# Altium PCB 24V-7A-Power-Board-v1.0.PcbDoc (part 1 of 4)
Units mil, origin at the board's own origin, x right, y up, seen from the top; angles counter-clockwise.
Board outline 6000 x 4000 mil, 2 copper layers (Top Layer, Bottom Layer); 157 components, 80 nets, 383 pads, 0 vias.
Unrouted connection lines stored in the file: 290.
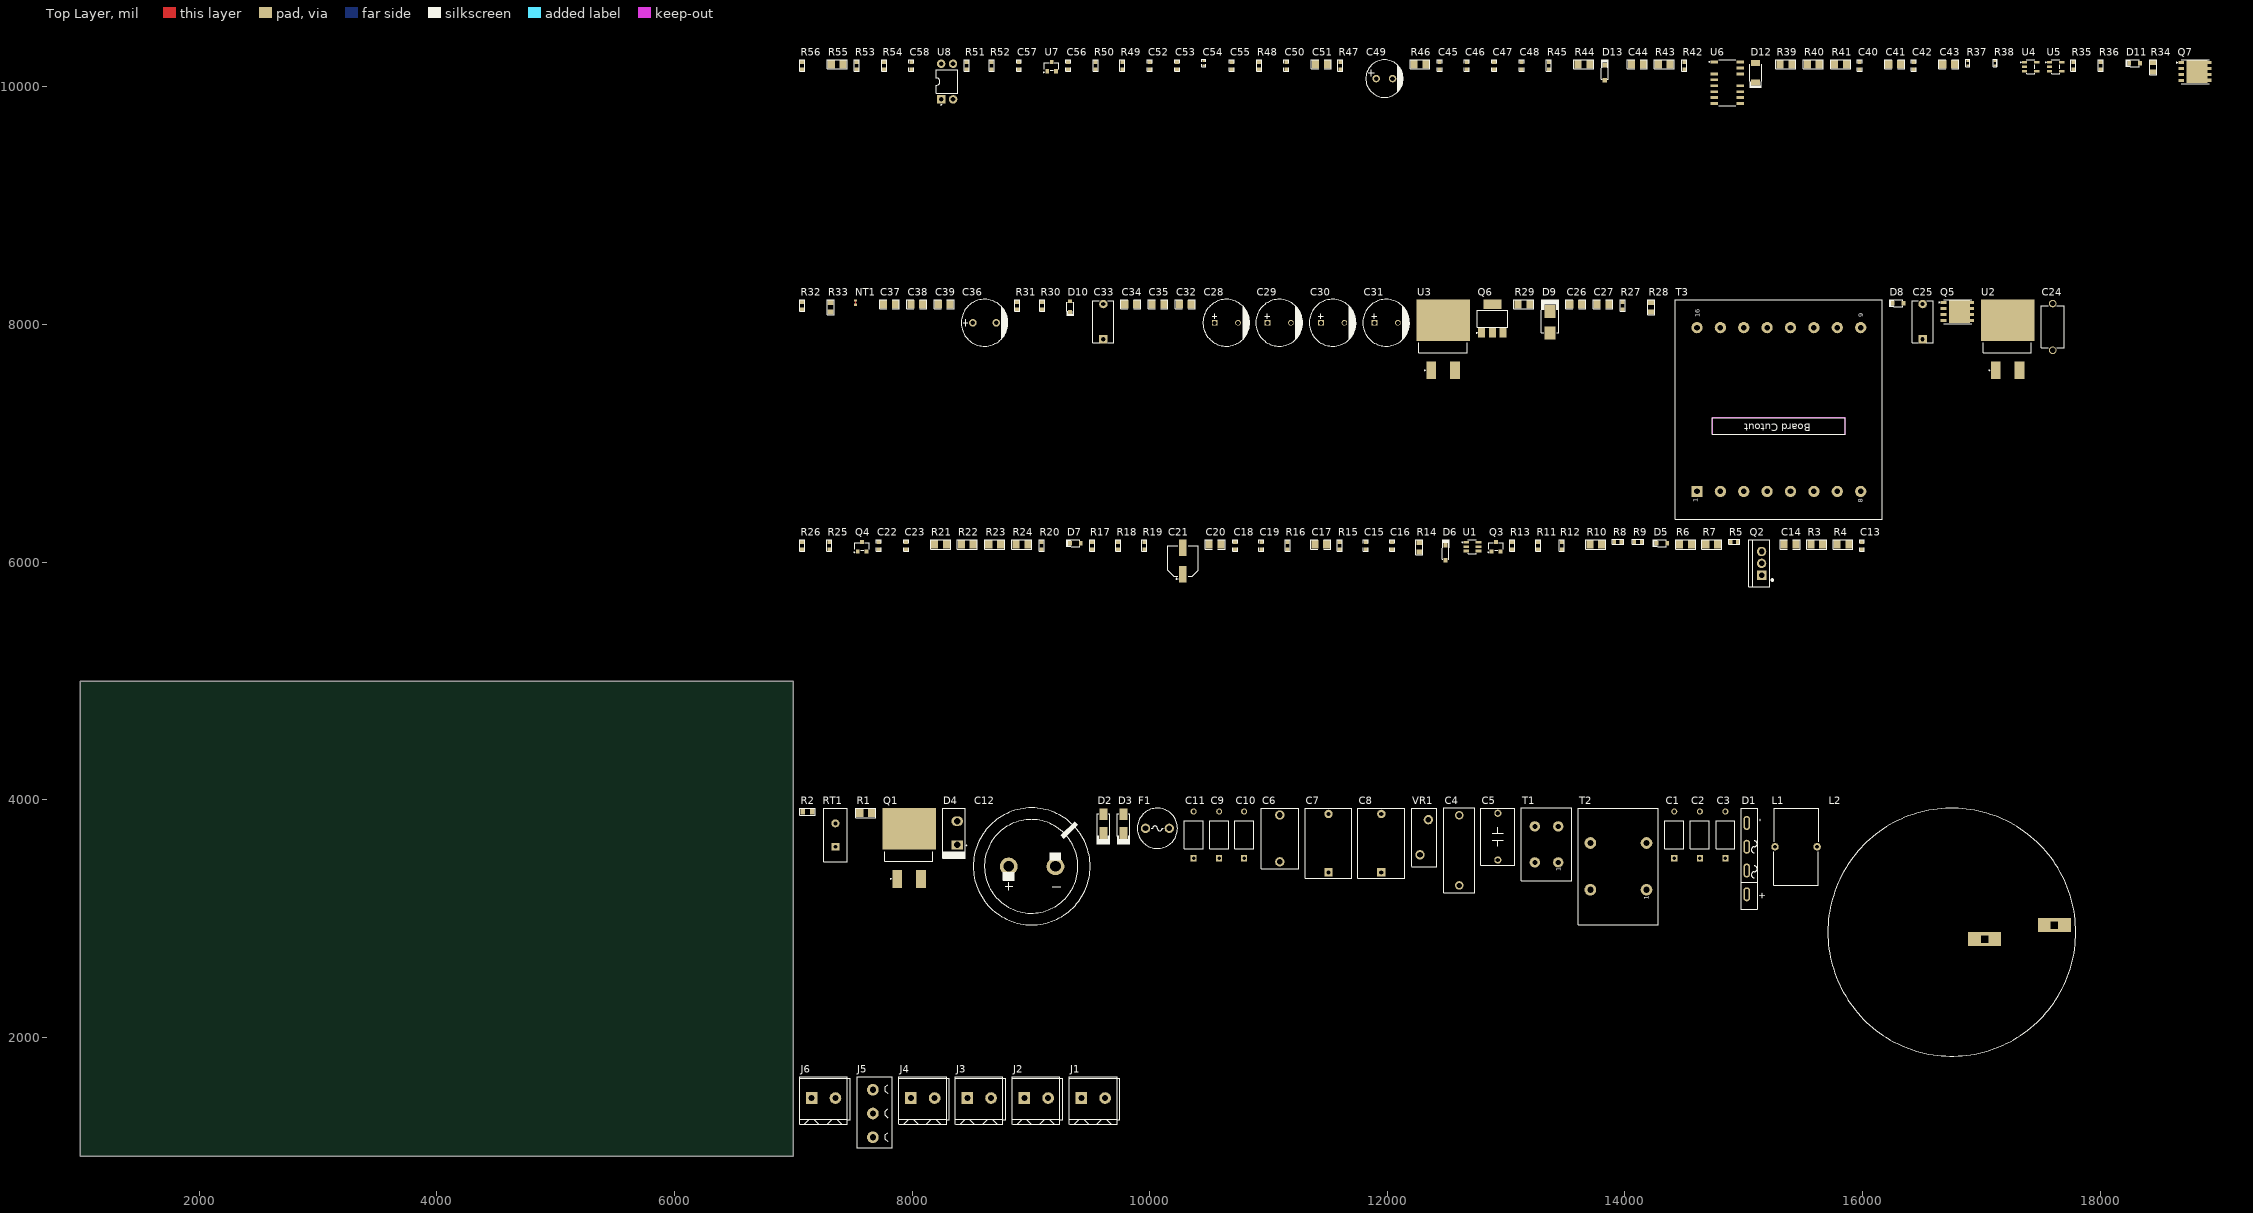
[diagram p0: Top Layer view]
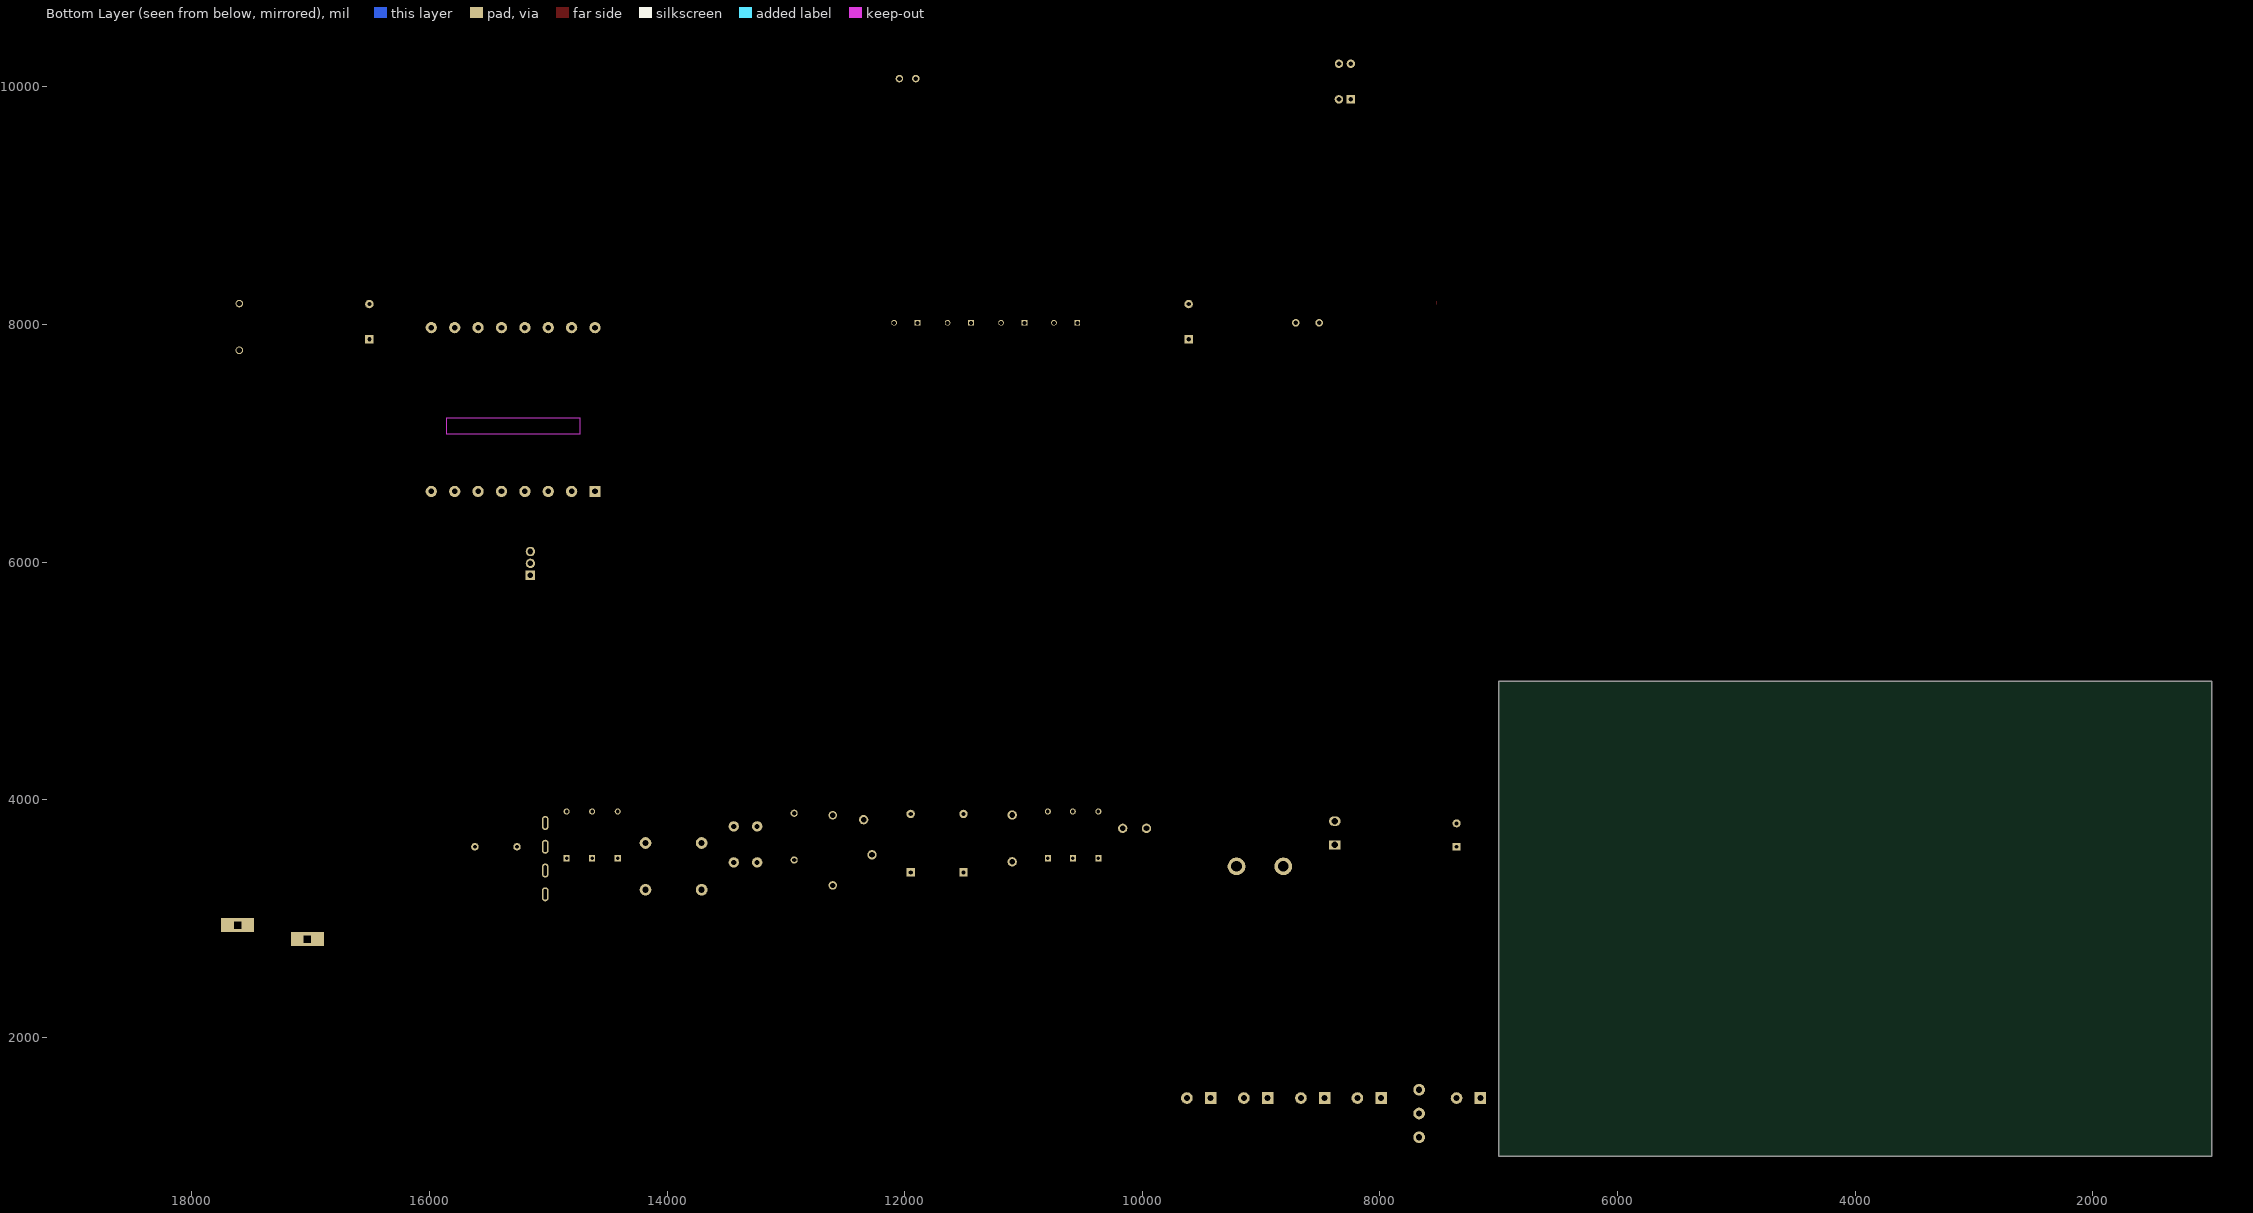
[diagram p1: Bottom Layer view, seen from below]

## Layer stack, top to bottom
Top Solder: solder mask 0.4, Solder Resist, Dk 3.5
Top Layer: signal copper 1.4
Dielectric 1: dielectric 12.6, FR-4, Dk 4.8
Bottom Layer: signal copper 1.4
Bottom Solder: solder mask 0.4, Solder Resist, Dk 3.5

## Board outline
1000,1000 7000,1000 7000,5000 1000,5000

## Design rules (kind name [scope] priority, off if disabled: settings)
Clearance [All] p1: gap=10 ignorepadtopadclearanceinfootprint=FALSE
PolygonConnect [All] p1: connectstyle=Relief reliefconductorwidth=10 reliefentries=4 polygonreliefangle="90 Angle" airgapwidth=10
RoutingVias [All] p1: holewidth=28 width=50 viastyle="Through Hole" minholewidth=28 minwidth=50 maxholewidth=28 maxwidth=50
SolderMaskExpansion [All] p1: expansion=4 istentingtop=FALSE
SupplyNets "Schematic Supply Nets_4" [InNet('GND')] p1: voltage=0.000
SupplyNets "Schematic Supply Nets_3" [InNet('SGND')] p2: voltage=0.000
SupplyNets "Schematic Supply Nets_2" [InNet('AC_N')] p3: voltage=0.000
SupplyNets "Schematic Supply Nets_1" [InNet('EARTH')] p4: voltage=0.000
SupplyNets "Schematic Supply Nets" [InNet('AC_L')] p5: voltage=0.000
Width [All] p1: maxlimit=10 minlimit=10 preferedwidth=10
30 further rules are at their usual default settings.

## Classes and differential pairs
component class U_Power_Controller_Sheet: C24 C25 C26 C27 C28 C29 C30 C31 C32 C33 C34 C35 C36 C37 C38 C39 C40 C41 C42 C43 C44 C45 C46 C47 C48 C49 C50 C51 C52 C53 C54 C55 C56 C57 C58 D8 D9 D10 D11 D12 D13 NT1 Q5 Q6 Q7 R27 R28 R29 R30 R31 R32 R33 R34 R35 R36 R37 R38 R39 R40 R41 R42 R43 R44 R45 R46 R47 R48 R49 R50 R51 R52 R53 R54 R55 R56 T3 U2 U3 U4 U5 U6 U7 U8
component class U_PFC_Sheet: C1 C2 C3 C4 C5 C6 C7 C8 C9 C10 C11 C12 C13 C14 C15 C16 C17 C18 C19 C20 C21 C22 C23 D1 D2 D3 D4 D5 D6 D7 F1 L1 L2 Q1 Q2 Q3 Q4 R1 R2 R3 R4 R5 R6 R7 R8 R9 R10 R11 R12 R13 R14 R15 R16 R17 R18 R19 R20 R21 R22 R23 R24 R25 R26 RT1 T1 T2 U1 VR1
component class U_Connector_Sheet: J1 J2 J3 J4 J5 J6

## Components (designator, comment, footprint, x,y, rotation, side; value= is the part's Value field where it differs from the comment)
C1 "100pF" DE1B3RA101KN4AN01F 14415,3705 r90 top
C2 "220pF" DE1B3RA221KN4AN01F 14630,3705 r90 top
C3 "220pF" DE1B3RA221KN4AN01F 14845,3705 r90 top
C4 "470nF" 450MPK474J 12605,3575 r90 top
C5 "MPP105J2W10KN22605" MPP105J2W10KN22605 12930,3690 r90 top
C6 "220nF" X2P2224KN1B0130150080ES0 11095,3675 r90 top
C7 "0.47UF" 890324024005 11505,3635 r90 top
C8 "0.47UF" 890324024005 11950,3635 r90 top
C9 "220pF" DE1B3RA221KN4AN01F 10585,3705 r90 top
C10 "220pF" DE1B3RA221KN4AN01F 10795,3705 r90 top
C11 "100pF" DE1B3RA101KN4AN01F 10370,3705 r90 top
C12 "150uF" KN151M45025*30A 9010,3440 r0 top
C13 "0.1uF" Cap-0603 15995,6140 r90 top value=100nF
C14 "10pF" Cap-1206 15390,6150 r0 top
C15 "3.9nF" Cap-0603 11820,6140 r90 top
C16 "560pF" Cap-0603 12040,6140 r90 top
C17 "470nF" Cap-1206 11440,6150 r0 top
C18 "68nF" Cap-0603 10720,6140 r90 top
C19 "0.22uF" Cap-0603 10940,6140 r90 top
C20 "0.47uF" Cap-1206 10550,6150 r0 top
C21 "10uF" 50SVPF10M 10280,6010 r90 top
C22 "06031C102KAT2A" Cap-0603 7720,6140 r90 top
C23 "10pF" Cap-0603 7950,6140 r90 top
C24 "2.2nF" DE1E3RA222MA4BN01F 17600,7980 r90 top
C25 "KP223J2J0701" KP223J2J0701 16505,8025 r90 top
C26 "4.7uF" Cap-1206 13585,8170 r0 top
C27 "4.7uF" Cap-1206 13815,8170 r0 top
C28 "680uF" EEU-FR1V681B 10645,8015 r0 top
C29 "680uF" EEU-FR1V681B 11090,8015 r0 top
C30 "680uF" EEU-FR1V681B 11540,8015 r0 top
C31 "680uF" EEU-FR1V681B 11990,8015 r0 top
C32 "0.1uF" Cap-1206 10300,8170 r0 top value=100nF
C33 "KP223J2J0701" KP223J2J0701 9610,8025 r90 top
C34 "150pF" Cap-1206 9840,8170 r0 top
C35 "100pF" Cap-1206 10070,8170 r0 top
C36 "470uF" EEUFR1V471B 8610,8015 r0 top
C37 "2.2uF" Cap-1206 7810,8170 r0 top
C38 "4.7uF" Cap-1206 8040,8170 r0 top
C39 "4.7uF" Cap-1206 8270,8170 r0 top
C40 "2.2uF" CAP-0603 15975,10180 r90 top
C41 "0.1uF" Cap-1206 16270,10190 r0 top value=100nF
C42 "2.2uF" CAP-0603 16430,10180 r90 top
C43 "0.1uF" Cap-1206 16725,10190 r0 top value=100nF
C44 "2.2uF" Cap-1206 14105,10190 r0 top
C45 "4.7uF" Cap-0603 12440,10180 r90 top
C46 "4.7uF" Cap-0603 12670,10180 r90 top
C47 "4.7uF" Cap-0603 12900,10180 r90 top
C48 "0.01uF" Cap-0603 13130,10180 r90 top
C49 "330uF" RC035M331LO8*14TH-2A1E 11975,10070 r0 top
C50 "2.2uF" Cap-0603 11150,10180 r90 top
C51 "1uF" Cap-1206 11445,10190 r0 top
C52 "220pF" Cap-0603 10000,10180 r90 top
C53 "10nF" Cap-0603 10230,10180 r90 top
C54 "47pF" Cap-0402 10455,10200 r90 top
C55 "82nF" Cap-0603 10690,10180 r90 top
C56 "4.7nF" Cap-0603 9315,10180 r90 top
C57 "470pF" Cap-0603 8900,10180 r90 top
C58 "47pF" Cap-0603 7995,10180 r90 top
D1 "GBU806" GBU 15025,3505 r90 top
D2 "MURA160T3G" SMA 9610,3800 r90 top
D3 "MURA160T3G" SMA 9780,3800 r90 top
D4 "STTH8L06FP" TO-220-2 8380,3720 r90 top
D5 "MMDL914-TP" SOD-323 14310,6160 r0 top
D6 "1N4148W" SOD-123 12490,6080 r90 top
D7 "MMDL914-TP" SOD-323 9375,6160 r0 top
D8 "MMDL914-TP" SOD-323 16300,8180 r0 top
D9 "STPS160UY" SMB_ 13370,8020 r90 top
D10 "MMDL914-TP" SOD-323 9330,8150 r90 top
D11 "MMSZ5250BS-7-F" SOD-323 18290,10200 r0 top
D12 "ES1JAF" "DO-214AD (SMAF)" 15100,10120 r90 top value=15pF
D13 "1N4148W-7-F" SOD-123 13830,10120 r90 top value=2pF
F1 "5A 250VAC" 37215000001 10065,3760 r0 top
J1 "WJ500V-5.08-2P" WJ500V-5.08-2P 9525,1490 r0 top
J2 "WJ500V-5.08-2P" WJ500V-5.08-2P 9045,1490 r0 top
J3 "WJ500V-5.08-2P" WJ500V-5.08-2P 8565,1490 r0 top
J4 "WJ500V-5.08-2P" WJ500V-5.08-2P 8090,1490 r0 top
J5 "WJ500V-5.08-3P" WJ500V-5.08-3P 7670,1160 r90 top
J6 "WJ500V-5.08-2P" WJ500V-5.08-2P 7255,1490 r0 top
L1 "100uH" 7447021 15440,3605 r90 top
L2 "118uH" 760801401 17615,2945 r0 top
NT1 "Net Tie_SMD" "Net Tie Pad" 7525,8185 r90 top net-tie
Q1 "STB26NM60N" TO-263 7975,3545 r0 top
Q2 "IPP60R099C7XKSA1" TO-220-3 15150,5990 r90 top
Q3 "SI2309CDS-T1-E3" SOT-23 12915,6130 r0 top
Q4 "MMBT4401-7-F" SOT-23 7580,6130 r0 top
Q5 "CSD19502Q5B" VSON-CLIP-8(6x5) 16800,8110 r0 top
Q6 "FZT651TA" "SOT- 223" 12885,8050 r0 top
Q7 "CSD19502Q5B" VSON-CLIP-8(6x5) 18800,10130 r0 top
R1 "3.09MR" Res-1206 7610,3890 r0 top
R2 "1M" RES-0805 7120,3900 r0 top value=1MR
R3 "3.3MR" Res-1206 15615,6150 r0 top
R4 "3.09MR" Res-1206 15835,6150 r0 top
R5 "10R" Res-0603 14920,6170 r0 top
R6 "3.3MR" Res-1206 14510,6150 r0 top
R7 "3.3MR" Res-1206 14730,6150 r0 top
R8 "1R" Res-0603 13940,6170 r0 top
R9 "82.5K" Res-0603 14110,6170 r0 top
R10 "3.3MR" Res-1206 13755,6150 r0 top
R11 "36.5K" Res-0603 13270,6140 r90 top
R12 "120K" Res-0603 13470,6140 r90 top value=120kR
R13 "3K" Res-0603 13050,6140 r90 top value=3kR
R14 "10R" RES-0805 12270,6125 r90 top
R15 "24.3K" Res-0603 11600,6140 r90 top
R16 "100K" Res-0603 11160,6140 r90 top value=100kR
R17 "390K" Res-0603 9515,6140 r90 top value=390kR
R18 "75K" Res-0603 9735,6140 r90 top value=75kR
R19 "75K" Res-0603 9955,6140 r90 top value=75kR
R20 "140K" Res-0603 9090,6140 r90 top
R21 "130mR" Res-1206 8240,6150 r0 top
R22 "130mR" Res-1206 8465,6150 r0 top
R23 "150mR" Res-1206 8695,6150 r0 top
R24 "150mR" Res-1206 8925,6150 r0 top
R25 "390K" Res-0603 7305,6140 r90 top value=390kR
R26 "49K9" Res-0603 7075,6140 r90 top
R27 "10R" Res-0603 13980,8160 r90 top
R28 "10K" RES-0805 14220,8145 r90 top
R29 "0R" Res-1206 13150,8170 r0 top value=0mR
R30 "26.1K" Res-0603 9095,8160 r90 top value=26.1kR
R31 "7.15K" Res-0603 8885,8160 r90 top
R32 "10R" Res-0603 7075,8160 r90 top
R33 "10K" RES-0805 7315,8145 r90 top
R34 "5.6K" RES-0805 18445,10165 r90 top value=5.6kR
R35 "10K" Res-0603 17775,10180 r90 top value=10kR
R36 "4.99K" Res-0603 18005,10180 r90 top
R37 "0R" Res-0402 16885,10200 r90 top
R38 "0R" Res-0402 17115,10200 r90 top
R39 "1.65K" Res-1206 15355,10190 r0 top
R40 "1.65K" Res-1206 15585,10190 r0 top
R41 "1.65K" Res-1206 15815,10190 r0 top
R42 "2.2R" Res-0603 14500,10180 r90 top
R43 "4.99MR" Res-1206 14330,10190 r0 top
R44 "4.99MR" Res-1206 13655,10190 r0 top
R45 "274K" Res-0603 13360,10180 r90 top
R46 "4.99MR" Res-1206 12275,10190 r0 top
R47 "100R" Res-0603 11605,10180 r90 top
R48 "301K" res-0603 10920,10180 r90 top
R49 "37.4K" Res-0603 9770,10180 r90 top
R50 "44.2K" Res-0603 9545,10180 r90 top
R51 "0R" Res-0603 8460,10180 r90 top
R52 "324K" Res-0603 8670,10180 r90 top value=324kR
R53 "324K" Res-0603 7535,10180 r90 top value=324kR
R54 "20R" Res-0603 7765,10180 r90 top
R55 "20K" Res-1206 7370,10190 r0 top
R56 "12.4K" Res-0603 7075,10180 r90 top value=12.4kR
RT1 "B57236S0100M000" B57236S0100M000 7355,3605 r90 top
T1 "744822301" 744822301 13340,3625 r90 top
T2 "744824310" 744824310 13945,3440 r90 top value=10mH
T3 "760895741" 760895741 15295,7285 r90 top value=400uH
U1 "UCC28056DBVT" SOT-23-6 12715,6130 r0 top
U2 "IPB65R150CFDA" TO-263 17220,7825 r0 top
U3 "IPB65R150CFDA" TO-263 12470,7825 r0 top
U4 "UCC24612-2DBVR" SOT-23-5 17415,10170 r0 top
U5 "UCC24612-2DBVR" SOT-23-5 17625,10170 r0 top
U6 "UCC256404DDBR" UCC256404DDBR 14860,10035 r0 top
U7 "ATL432LIAQDBZRQ1" SOT-23 9175,10170 r0 top
U8 "VO618A-3" DIP-4 8295,10045 r90 top
VR1 "B72210S2271K101" B72210S2271K101 12310,3685 r90 top value=195pF

## Footprints (in the part's own frame and the unit in brackets; to place one, negate y for a bottom-side part, rotate by r counter-clockwise, add the part's x,y. Pads: shape width x height; smd on the part's side, far side on the other; paste and mask are expansions set on the pad)
50SVPF10M [mm]
  rect 3.5x1.6 smd: 1(-2.8,0) 2(2.8,0)
  silkscreen extent -4.01,-3.3 3.3,3.3, body extent -3.65,-3.3 3.65,3.3, height 5.9
450MPK474J [mm]
  round 1.8 hole 1.092 paste-2539.97 mask+0: 1(-7.5,0) 2(7.5,0)
  silkscreen extent -9.06,-3.3 9.06,3.3, body extent -9,-3.25 9,3.25, height 11.8
7447021 [mm]
  round 1.6 hole 0.82: 1(0,4.5) 2(0,-4.5)
  silkscreen extent -8.25,-4.78 8.25,4.8, body extent -8.21,-4.75 8.21,4.75, height 16.41
744822301 [mm]
  round 2.2 hole 1.1: 1(-3.85,-2.5) 2(3.85,-2.5) 3(3.85,2.5) 4(-3.85,2.5)
  silkscreen extent -7.81,-5.43 7.81,5.43, body extent -7.76,-5.4 7.76,5.37, height 19.6
744824310 [mm]
  round 2.5 hole 1.3: 1(-5,-6) 2(5,-6) 3(5,6) 4(-5,6)
  silkscreen extent -12.45,-8.53 12.42,8.59, body extent -12.4,-8.5 12.4,8.53, height 29.58
760801401 [mm]
  rect 7x3 hole 1.5 square: 1(0,0) 2(-14.95,-3)
  round 0 hole 4.4 unplated: M1(-21.95,-1.5)
  silkscreen extent -48.45,-28 4.55,25, body extent -46.09,-25.64 5.01,22.54, height 27.69
760895741 [mm]
  rect 2.4x2.4 hole 1.2: 1(-17.5,17.5)
  round 2.4 hole 1.2: 2(-17.5,12.5) 3(-17.5,7.5) 4(-17.5,2.5) 5(-17.5,-2.5) 6(-17.5,-7.5) 7(-17.5,-12.5) 8(-17.5,-17.5) 9(17.5,-17.5) 10(17.5,-12.5) 11(17.5,-7.5) 12(17.5,-2.5) 13(17.5,2.5) 14(17.5,7.5) 15(17.5,12.5) 16(17.5,17.5)
  Keep-Out Layer board cut-out: -1.8,14.25 -5.3,14.25 -5.3,-14.25 -1.8,-14.25
  silkscreen extent -23.42,-22.12 23.42,22.12, body extent -23.3,-22 23.3,22, height 26.85
37215000001 [mm]
  round 2 hole 1.2 paste-2539.97 mask+0.051: 1(-2.54,0) 2(2.54,0)
  silkscreen extent -4.3,-4.3 4.3,4.3, body extent -4.2,-4.19 4.2,4.19, height 8
890324024005 [mm]
  rect 1.8x1.8 hole 0.92: 1(-6.25,0)
  round 1.8 hole 0.92: 2(6.25,0)
  silkscreen extent -7.5,-5 7.5,5, body extent -7.5,-5 7.5,5, height 16.2
B57236S0100M000 [mm]
  rect 1.7x1.7 hole 0.85: 1(0,0)
  round 1.7 hole 0.85: 2(5,0)
  silkscreen extent -3.25,-2.5 8.25,2.5, body extent -3.25,-3 8.25,3, height 15.98
B72210S2271K101 [mm]
  round 2 hole 1.2 paste-2539.97 mask+0.051: 1(-3.749,0.899) 2(3.749,-0.899)
  silkscreen extent -6.27,-2.72 6.25,2.7, body extent -6.25,-2.7 6.25,2.7, height 13.35
Cap-0402 [mil]
  rect 18x25 smd mask+2.36: 1(-18.5,0) 2(18.5,0)
  silkscreen extent -31,-16 31,16, body extent -20,-10 20,10, height 19
Cap-0603 [mil]
  rect 30x35 smd mask+2.36: 1(-30,0) 2(30,0)
  silkscreen extent -49,-21 49,21, body extent -32,-16 31,16, height 34
CAP-0603 [mil]
  rect 30x35 smd mask+2.36: 1(-30,0) 2(30,0)
  silkscreen extent -49,-21 49,21, body extent -32,-16 31,16, height 34
Cap-1206 [mil] "SMD 1206"
  rect 60x70 smd: 1(-50,0) 2(50,0)
  silkscreen extent -84,-39 84,39, body extent -63,-31 63,32, height 39
DE1B3RA101KN4AN01F [mm]
  rect 1.3x1.3 hole 0.8: 1(-5,0)
  round 1.3 hole 0.8: 2(5,0)
  silkscreen extent -3,-2 3,2, body extent -5.5,-2 5.5,2, height 9
DE1B3RA221KN4AN01F [mm]
  rect 1.3x1.3 hole 0.8: 1(-5,0)
  round 1.3 hole 0.8: 2(5,0)
  silkscreen extent -3,-2 3,2, body extent -5.5,-2 5.5,2, height 9
DE1E3RA222MA4BN01F [mm]
  round 1.6 hole 1.1 paste-2539.97 mask+0.051: 1(-5,0) 2(5,0)
  silkscreen extent -4.5,-2.5 4.5,2.5, body extent -5.34,-2.53 5.34,2.47, height 13
DIP-4 [mm]
  rect 1.8x1.8 hole 1 paste-2539.97 mask+0.051: 1(-3.81,1.265)
  round 1.8 hole 1 copper offset 0,0 paste-2539.97 mask+0.051: 2(-3.81,-1.275) 3(3.81,-1.265) 4(3.81,1.275)
  silkscreen extent -4.98,-2.28 2.53,2.29, body extent -3.91,-2.3 3.91,2.3, height 4.29
"DO-214AD (SMAF)" [mm]
  rect 1.34x1.9 smd paste+0 mask+0.051: 1(-2.08,0) 2(2.08,0)
  silkscreen extent -3.28,-1.3 1.75,1.3, body extent -2.35,-1.25 2.35,1.25, height 1
EEU-FR1V681B [mm]
  rect 1.2x1.2 hole 0.85: 1(-2.5,0)
  round 1.2 hole 0.85: 2(2.5,0)
  silkscreen extent -5,-5 5.03,5, body extent -5,-5 5,5, height 20
EEUFR1V471B [mm]
  round 1.6 hole 1 paste-2539.97 mask+0.05: 1(-2.5,0) 2(2.5,0)
  silkscreen extent -5,-5 5,5, body extent -4.99,-5 5,5, height 24.91
GBU [mm]
  oval 3x1.4 hole 0.7 slot 2.2 at 0 deg paste-2539.97 mask+0.051: 1(-7.62,0) 2(-2.54,0) 3(2.54,0) 4(7.62,0)
  silkscreen extent -10.8,-2.28 10.79,1.25, body extent -10.75,-2.26 10.75,1.2, height 19.9
KN151M45025*30A [mm]
  round 3.8 hole 2.3 paste-2539.97 mask+0.05: 1(-5,0) 2(5,0)
  silkscreen extent -12.58,-12.5 12.42,12.5, body extent -12.51,-12.49 12.5,12.5, height 40.01
KP223J2J0701 [mm]
  rect 1.8x1.8 hole 0.914 paste-2539.97 mask+0.051: 1(-3.75,0)
  round 1.8 hole 0.914 paste-2539.97 mask+0.051: 2(3.75,0)
  silkscreen extent -4.5,-2.25 4.5,2.25, body extent -4.5,-2.2 4.5,2.2, height 11.57
MPP105J2W10KN22605 [mil]
  round 60 hole 36 paste-99999 mask+1.97: 1(-196.85,0) 2(196.85,0)
  silkscreen extent -239,-142 239,142, body extent -236,-140 236,140, height 673
"Net Tie Pad" [mil]
  rect 18x25 smd mask-10: 1(-18.5,0) 2(18.5,0)
  Top Layer region: -15,-5 15,-5 15,5 -15,5
RC035M331LO8*14TH-2A1E [mm]
  round 1.6 hole 1 paste-2539.97 mask+0.051: 1(-1.75,0) 2(1.75,0)
  silkscreen extent -3.96,-4 4.04,4, body extent -4,-4.01 4,4, height 8
Res-0402 [mil]
  rect 18x25 smd mask+2.17: 1(-18.5,0) 2(18.5,0)
  silkscreen extent -32,-17 32,16, body extent -23,-11 23,11, height 16
Res-0603 [mil]
  rect 30x35 smd: 1(-30,0) 2(30,0)
  silkscreen extent -48,-21 48,21, body extent -31,-17 31,17, height 18
res-0603 [mil]
  rect 30x35 smd: 1(-30,0) 2(30,0)
  silkscreen extent -48,-21 48,21, body extent -31,-17 31,17, height 18
RES-0805 [mil] "SMD 0805"
  rect 40x50 smd: 1(-40,0) 2(40,0)
  silkscreen extent -64,-29 64,29, body extent -39,-25 39,24, height 24
Res-1206 [mil]
  rect 60x70 smd: 1(-50,0) 2(50,0)
  silkscreen extent -84,-39 84,39, body extent -63,-31 63,31, height 24
SMA [mm]
  rect 2.5x1.7 smd: 1(-2,0) 2(2,0)
  silkscreen extent -4.45,-1.42 2.06,1.42, body extent -2.6,-1.3 2.6,1.3, height 2.4
SMB_ [mm]
  rect 2.8x2.4 smd: 1(-2.3,0) 2(2.3,0)
  silkscreen extent -2.21,-1.91 4.83,1.91, body extent -2.7,-1.8 2.7,1.8, height 2.3
SOD-123 [mm]
  rect 0.95x0.9 smd: 1(-1.575,0) 2(1.575,0)
  silkscreen extent -1.37,-0.8 2.82,0.8, body extent -1.82,-0.78 1.83,0.78, height 1.5
SOD-323 [mm]
  rect 0.8x0.9 smd mask+0.055: 1(-1.15,0) 2(1.15,0)
  silkscreen extent -2.01,-0.79 0.94,0.79, body extent -1.3,-0.67 1.3,0.67, height 1.1
SOT-23 [mm] "TRANS NPN 40V 0.6A SOT23"
  rect 0.82x0.92 smd: 1(-0.95,-1) 2(0.95,-1) 3(0,1)
  silkscreen extent -1.68,-1.3 1.55,0.81, body extent -1.5,-1.25 1.5,1.25, height 1.05
SOT-23-5 [mm]
  rect 1.1x0.6 smd: 1(-1.3,0.95) 2(-1.3,0) 3(-1.3,-0.95) 4(1.3,-0.95) 5(1.3,0.95)
  silkscreen extent -2.13,-1.5 0.88,1.5, body extent -1.4,-1.45 1.4,1.45, height 1.45
SOT-23-6 [mm]
  rect 1.22x0.62 smd: 1(-1.31,0.95) 2(-1.31,0) 3(-1.31,-0.95) 4(1.31,-0.95) 5(1.31,0) 6(1.31,0.95)
  silkscreen extent -2.18,-1.52 0.86,1.52, body extent -1.5,-1.5 1.5,1.5, height 1.47
"SOT- 223" [mm]
  rect 1.5x2 smd: 1(-2.3,-3.05) 2(0,-3.05) 3(2.3,-3.05)
  rect 3.8x2 smd: 4(0,3.05)
  silkscreen extent -3.35,-3.2 3.3,1.8, body extent -3.25,-3.5 3.25,3.5, height 1.61
TO-220-2 [mm]
  rect 2x2.5 hole 1.4 paste-2539.97 mask+0.051: 1(-2.54,0)
  oval 2x2.5 hole 1.4 paste-2539.97 mask+0.051: 2(2.54,0)
  silkscreen extent -5.35,-2.06 5.35,3.13, body extent -5.33,-1.71 5.33,3.1, height 22.95
TO-220-3 [mm]
  rect 2x2 hole 1.2 paste-2539.97 mask+0.051: 1(-2.54,0)
  round 2 hole 1.2 paste-2539.97 mask+0.051: 2(0,0) 3(2.54,0)
  silkscreen extent -5,-2.49 5.03,2.72, body extent -5.05,-1.75 5.05,2.75, height 14.9
TO-263 [mm]
  rect 2.08x3.81 smd: 1(-2.54,-5.335) 3(2.54,-5.335)
  rect 11.43x8.89 smd: 2(0,5.335)
  silkscreen extent -5.21,-5.46 5.11,0.51, body extent -5.08,-6.6 5.02,8.79, height 4.5
UCC256404DDBR [mm]
  rect 1.55x0.6 smd paste+0 mask+0.05: 1(-2.775,4.445) 3(-2.775,1.905) 4(-2.775,0.635) 5(-2.775,-0.635) 6(-2.775,-1.905) 7(-2.775,-3.175) 8(-2.775,-4.445) 9(2.775,-4.445) 10(2.775,-3.175) 11(2.775,-1.905) 12(2.775,-0.635) 14(2.775,1.905) 15(2.775,3.175) 16(2.775,4.445)
  silkscreen extent -3.82,-4.9 1.8,4.9, body extent -3,-4.95 3,4.95, height 1.75
VSON-CLIP-8(6x5) [mm]
  rect 1.27x0.7 smd paste-100 mask+0.051: 1(-3,1.904) 2(-3,0.636) 3(-3,-0.636) 4(-3,-1.906)
  rect 1x0.7 smd paste-100 mask+0.051: 5(3,-1.904) 6(3,-0.634) 7(3,0.636) 8(3,1.906)
  rect 4.5x4.9 smd paste-100 mask+0.051: 8(0.39,0.001)
  silkscreen extent -3.91,-2.57 3,2.55, body extent -3,-2.45 3,2.45, height 1.1
WJ500V-5.08-2P [mm]
  rect 2.5x2.5 hole 1.3 paste-2539.97 mask+0.051: 1(-2.54,0)
  round 2.5 hole 1.3 paste-2539.97 mask+0.051: 2(2.54,0)
  silkscreen extent -5.08,-5.56 5.68,4.6, body extent -5.08,-5.5 5.68,4.5, height 14
WJ500V-5.08-3P [mm]
  round 2.5 hole 1.3: 1(0,0) 2(5.08,0) 3(10.16,0)
  silkscreen extent -2.29,-4.11 12.95,3.49, body extent -2.22,-4.07 12.95,3.43, height 10
X2P2224KN1B0130150080ES0 [mm]
  round 2 hole 1.2 paste-2539.97 mask+0.05: 1(-5,0) 2(5,0)
  silkscreen extent -6.5,-4 6.5,4, body extent -6.5,-4 6.5,4, height 15

## Part data
C1 C11: library part DE1B3RA101KN4AN01F, "CAP CER 100PF 250V RADIAL", LCSC Part Number=C3285641, Manufacturer=Murata, ComponentLink1Description=https://search.murata.co.jp/Ceramy/image/img/A01X/G101/ENG/DE1_RA_N01F_E.pdf?src-supplier=Digikey, ComponentLink1URL=https://search.murata.co.jp/Ceramy/image/img/A01X/G101/ENG/DE1_RA_N01F_E.pdf?src-supplier=Digikey, Height=9mm, Item Type=Capacitors, Manufacturer Part Number=DE1B3RA101KN4AN01F, Material=4241ConductorMaterial, Pricing="1=0.3, 10=0.147, 50=0.147, 100=0.123, 1000=0.089, 10000=0.061 (USD)", RoHS=Yes, Stock=583, Supplier=Mouser
C2 C3 C9 C10: library part DE1B3RA221KN4AN01F, "CAP CER 220PF 250V RADIAL", LCSC Part Number=C1622503, Manufacturer=Murata, ComponentLink1Description=https://search.murata.co.jp/Ceramy/image/img/A01X/G101/ENG/DE1_RA_N01F_E.pdf?src-supplier=Digikey, ComponentLink1URL=https://search.murata.co.jp/Ceramy/image/img/A01X/G101/ENG/DE1_RA_N01F_E.pdf?src-supplier=Digikey, Item Type="Suppression Capacitor", Manufacturer Part Number=DE1B3RA221KN4AN01F, Pricing="1=0.35, 10=0.168, 50=0.168, 100=0.141, 1000=0.107, 10000=0.069 (USD)", RoHS=Yes, Stock=985, Supplier=Mouser
C4: library part 450MPK474J, "CAP FILM 0.47UF 5% 450VDC RADIAL", Case/Package=Radial, Dielectric Material=Polypropylene, LCSC Part Number=C2798220, Manufacturer=Rubycon, Max Operating Temperature=105°C, Min Operating Temperature=-40°C, Package Quantity=1, Tolerance=5%, Voltage Rating (DC)=450V, ComponentLink1Description=https://datasheet.ciiva.com/6281/e-mpk-6281321.pdf?src-supplier=Digikey, ComponentLink1URL=https://datasheet.ciiva.com/6281/e-mpk-6281321.pdf?src-supplier=Digikey, ComponentLink2Description=https://datasheet.ciiva.com/15021/e-mpk-15021932.pdf?src-supplier=Digikey, ComponentLink2URL=https://datasheet.ciiva.com/15021/e-mpk-15021932.pdf?src-supplier=Digikey, Height - Seated (Max)=0.433inch, Item Type="Film Capacitors", Lead Pitch=0.591inch, Length=0.709inch, Manufacturer Part Number=450MPK474J, Mounting Technology="Through Hole", Packaging="Cut Tape", Pricing="1=0.84, 10=0.605, 100=0.4311, 4000=0.26942, 8000=0.25962, 12000=0.25531 (USD)", RoHS=Yes, RoHS Compliant=Yes, Series=MPK, Stock=4083, Supplier=Digikey, Termination="PC Pins", Width=0.256inch
C5: "1uF -40℃~+105℃ ±5% 450V Plugin,P=10mm Polypropylene Film Capacitors (CBB) ROHS", LCSC Part Number=C2686214, Manufacturer=KNSCHA, Item Type=Capacitor, Manufacturer Part Number=MPP105J2W10KN22605, RoHS=No, Supplier=LCSC
C6: library part X2P2224KN1B0130150080ES0, "220nF ±10% X2 275V Plugin,P=10mm Suppression Capacitors ROHS", LCSC Part Number=C286022, Manufacturer=STE, Package=Plugin,P=10mm, ComponentLink1Description=LCSC, ComponentLink1URL=https://www.lcsc.com/product-detail/Suppression-Capacitors_STE-Songtian-Elec-X2P2224KN1B0130150080ES0_C286022.html, Item Type="Suppression Capacitor", Manufacturer Part Number=X2P2224KN1B0130150080ES0
C7 C8: library part 890324024005, "CAP FILM 0.47UF 10% 275VAC RAD", Manufacturer="Wurth Electronics", Supplier Part Number=732-5890-ND, ComponentLink1Description=http://www.farnell.com/datasheets/1867975.pdf?src-supplier=Farnell, ComponentLink1URL=http://www.farnell.com/datasheets/1867975.pdf?src-supplier=Farnell, ComponentLink2Description=http://www.farnell.com/datasheets/1867975.pdf?src-supplier=Element14, ComponentLink2URL=http://www.farnell.com/datasheets/1867975.pdf?src-supplier=Element14, ComponentLink3Description=https://katalog.we-online.de/pbs/datasheet/890324024005.pdf?src-supplier=Digikey, ComponentLink3URL=https://katalog.we-online.de/pbs/datasheet/890324024005.pdf?src-supplier=Digikey, ComponentLink4Description=http://www.farnell.com/datasheets/1867975.pdf?src-supplier=Newark, ComponentLink4URL=http://www.farnell.com/datasheets/1867975.pdf?src-supplier=Newark, Item Type=Capacitor, Manufacturer Part Number=890324024005, Pricing="1=0.75, 50=0.645, 100=0.574, 250=0.501, 500=0.454, 1000=0.418 (USD)", RoHS=Yes, Stock=13537, Supplier=Digikey
C12: library part KN151M45025*30A, "20% 900mA@120Hz 10mm 450V 150uF Plugin,D25xL30mm Horn-Type Electrolytic Capacitors ROHS", LCSC Part Number=C513373, Manufacturer=KFSON, Package=Plugin,D25xL30mm, ComponentLink1Description=LCSC, ComponentLink1URL=https://www.lcsc.com/product-detail/Horn-Type-Electrolytic-Capacitors_KFSON-KN151M45025-30A_C513373.html, Item Type=Capacitor, Manufacturer Part Number=KN151M45025*30A
C13: library part CL10B104KB8WPNC, "CAP CER 0.1UF 50V X7R 0603", Case Code (Imperial)=0603, Case Code (Metric)=1608, LCSC Part Number=C307348, Max Operating Temperature=125°C, Min Operating Temperature=-55°C, Ratings=AEC-Q200, Supplier Part Number=2575919, Tolerance=10%, Voltage Rating=50V, Case/Package=0603, Category="Ceramic Capacitors", ComponentLink1Description=LCSC, ComponentLink2Description=http://www.farnell.com/datasheets/2710560.pdf?src-supplier=Farnell, ComponentLink2URL=http://www.farnell.com/datasheets/2710560.pdf?src-supplier=Farnell, ComponentLink3Description=http://www.samsungsem.com/kr/support/product-search/mlcc/CL10B104KB8WPNC.jsp?src-supplier=Digi-Key, ComponentLink3URL=http://www.samsungsem.com/kr/support/product-search/mlcc/CL10B104KB8WPNC.jsp?src-supplier=Digi-Key, ComponentLink4Description=http://www.farnell.com/datasheets/2710560.pdf?src-supplier=Element14, ComponentLink4URL=http://www.farnell.com/datasheets/2710560.pdf?src-supplier=Element14, ComponentLink5Description=https://datasheet.octopart.com/CL10B104KB8WPNC-Samsung-Electro-Mechanics-datasheet-120093645.pdf?src-supplier=Future+Electronics, ComponentLink5URL=https://datasheet.octopart.com/CL10B104KB8WPNC-Samsung-Electro-Mechanics-datasheet-120093645.pdf?src-supplier=Future+Electronics, ComponentLink6Description=http://www.farnell.com/datasheets/2710560.pdf?src-supplier=Newark, ComponentLink6URL=http://www.farnell.com/datasheets/2710560.pdf?src-supplier=Newark, ComponentLink7Description=http://www.samsungsem.com/servlet/FileDownload?type=spec&file=CL10B104KB8WPNC.pdf&src-supplier=Avnet, ComponentLink7URL=http://www.samsungsem.com/servlet/FileDownload?type=spec&file=CL10B104KB8WPNC.pdf&src-supplier=Avnet, ComponentLink8Description=https://datasheet.octopart.com/CL10B104KB8WPNC-Samsung-datasheet-8326407.pdf?src-supplier=TME, ComponentLink8URL=https://datasheet.octopart.com/CL10B104KB8WPNC-Samsung-datasheet-8326407.pdf?src-supplier=TME, Height=900um, Item Type=Capacitor, Lead Free=5697LeadFree, Material=4241ConductorMaterial, Mounting Technology="Surface Mount", Packaging="Cut Tape", Pricing="100=0.021, 500=0.019, 1000=0.015, 2000=0.01 (GBP)", RoHS=Yes, RoHS Compliant=Yes, Series=CL, Stock=400, Supplier=Rs, Voltage Rating (DC)=50V
C14: library part CC1206JKNPOCBN100, "CAP CER 10PF 1KV C0G/NPO 1206", LCSC Part Number=C107172, Manufacturer=Yageo, ComponentLink1Description=https://datasheet.ciiva.com/11494/hv-11494856.pdf?src-supplier=Avnet, ComponentLink1URL=https://datasheet.ciiva.com/11494/hv-11494856.pdf?src-supplier=Avnet, Item Type=Capacitor, Manufacturer Part Number=CC1206JKNPOCBN100, Pricing="3000=0.0222, 9000=0.0214, 15000=0.021, 60000=0.0201, 90000=0.0194 (USD)", RoHS=Yes, Stock=9000, Supplier="Future Electronics"
C15: library part CC0603KRX7R8BB392, "CAP CER 3900PF 25V X7R 0603", Case Code (Imperial)=0603, Case Code (Metric)=1608, Dielectric=X7R, LCSC Part Number=C519424, Manufacturer=Yageo, Max Operating Temperature=125°C, Min Operating Temperature=-55°C, Tolerance=10%, Voltage Rating=25V, Case/Package=0603, ComponentLink1Description=https://datasheet.ciiva.com/13207/upy-gphc-x7r-6-3v-to-50v-8-12304-13207771.pdf?src-supplier=Mouser, ComponentLink1URL=https://datasheet.ciiva.com/13207/upy-gphc-x7r-6-3v-to-50v-8-12304-13207771.pdf?src-supplier=Mouser, Halogen Free="Halogen Free", Height=900um, Item Type=Capacitor, Lead Free="Lead Free", Length=0.063inch, Manufacturer Part Number=CC0603KRX7R8BB392, Material=4241ConductorMaterial, Mounting Technology="Surface Mount", Packaging="Tape and Reel", Pricing="1=0.1, 10=0.061, 50=0.035, 100=0.0271, 500=0.02036, 1000=0.016 (USD)", RoHS=Yes, Series=CC, Stock=46115, Supplier=Digikey, Termination=SMD/SMT, Thickness=0.035inch, Voltage Rating (DC)=25V, Weight=7.1E-05oz, Width=0.031inch
C16: library part 06035A561JAT2A, "CAP CER 560PF 50V C0G/NP0 0603", LCSC Part Number=C597173, Manufacturer="Kyocera AVX", ComponentLink1Description=https://datasheet.ciiva.com/27051/1032160-27051276.pdf?src-supplier=Jameco, ComponentLink1URL=https://datasheet.ciiva.com/27051/1032160-27051276.pdf?src-supplier=Jameco, ComponentLink2Description=https://datasheet.ciiva.com/16286/ccog-16286446.pdf?src-supplier=Future+Electronics, ComponentLink2URL=https://datasheet.ciiva.com/16286/ccog-16286446.pdf?src-supplier=Future+Electronics, ComponentLink3Description=https://datasheet.ciiva.com/150/ccog-150647.pdf?src-supplier=Digikey, ComponentLink3URL=https://datasheet.ciiva.com/150/ccog-150647.pdf?src-supplier=Digikey, ComponentLink4Description=https://datasheet.ciiva.com/150/ccog-150648.pdf?src-supplier=Digikey, ComponentLink4URL=https://datasheet.ciiva.com/150/ccog-150648.pdf?src-supplier=Digikey, ComponentLink5Description=https://datasheet.ciiva.com/150/ccog-150649.pdf?src-supplier=Digikey, ComponentLink5URL=https://datasheet.ciiva.com/150/ccog-150649.pdf?src-supplier=Digikey, ComponentLink6Description=https://datasheet.ciiva.com/2987/ccog-2987809.pdf?src-supplier=Avnet, ComponentLink6URL=https://datasheet.ciiva.com/2987/ccog-2987809.pdf?src-supplier=Avnet, ComponentLink7Description=https://datasheet.ciiva.com/2987/ccog-2987810.pdf?src-supplier=Avnet, ComponentLink7URL=https://datasheet.ciiva.com/2987/ccog-2987810.pdf?src-supplier=Avnet, ComponentLink8Description=https://datasheet.ciiva.com/5423/ccog-5423589.pdf?src-supplier=Mouser, ComponentLink8URL=https://datasheet.ciiva.com/5423/ccog-5423589.pdf?src-supplier=Mouser, ComponentLink9Description=https://datasheet.ciiva.com/14598/70001039-14598549.pdf?src-supplier=Allied+Electronics, ComponentLink9URL=https://datasheet.ciiva.com/14598/70001039-14598549.pdf?src-supplier=Allied+Electronics, ComponentLink10Description=https://datasheet.ciiva.com/1124/425357-1124836.pdf?src-supplier=Element14, ComponentLink10URL=https://datasheet.ciiva.com/1124/425357-1124836.pdf?src-supplier=Element14, ComponentLink11Description=https://datasheet.ciiva.com/1124/425357-1124837.pdf?src-supplier=Element14, ComponentLink11URL=https://datasheet.ciiva.com/1124/425357-1124837.pdf?src-supplier=Element14, Item Type=Capacitor, Manufacturer Part Number=06035A561JAT2A, Pricing="4000=0.0172, 16000=0.0165, 40000=0.0091, 60000=0.0158, 100000=0.0088, 120000=0.0155, 160000=0.0083, 300000=0.0148 (USD)", RoHS=Yes, Stock=180000, Supplier="Future Electronics"
C17: library part 12063C474KAT2A, "CAP CER 0.47UF 25V X7R 1206", LCSC Part Number=C5128353, Manufacturer="Kyocera AVX", ComponentLink1Description=https://datasheet.ciiva.com/11788/0900766b80dc2409-11788602.pdf?src-supplier=Rs, ComponentLink1URL=https://datasheet.ciiva.com/11788/0900766b80dc2409-11788602.pdf?src-supplier=Rs, ComponentLink2Description=https://datasheet.ciiva.com/19476/2014158-19476160.pdf?src-supplier=Jameco, ComponentLink2URL=https://datasheet.ciiva.com/19476/2014158-19476160.pdf?src-supplier=Jameco, ComponentLink3Description=https://datasheet.ciiva.com/14601/70001075-14601957.pdf?src-supplier=Allied+Electronics, ComponentLink3URL=https://datasheet.ciiva.com/14601/70001075-14601957.pdf?src-supplier=Allied+Electronics, ComponentLink4Description=https://datasheet.ciiva.com/28546/683218-28546839.pdf?src-supplier=Element14, ComponentLink4URL=https://datasheet.ciiva.com/28546/683218-28546839.pdf?src-supplier=Element14, ComponentLink5Description=https://datasheet.ciiva.com/7833/84526-7833365.pdf?src-supplier=Element14, ComponentLink5URL=https://datasheet.ciiva.com/7833/84526-7833365.pdf?src-supplier=Element14, ComponentLink6Description=https://datasheet.ciiva.com/16291/cx7r-16291039.pdf?src-supplier=Future+Electronics, ComponentLink6URL=https://datasheet.ciiva.com/16291/cx7r-16291039.pdf?src-supplier=Future+Electronics, ComponentLink7Description=https://datasheet.ciiva.com/152/cx7r-152592.pdf?src-supplier=Digikey, ComponentLink7URL=https://datasheet.ciiva.com/152/cx7r-152592.pdf?src-supplier=Digikey, ComponentLink8Description=https://datasheet.ciiva.com/152/cx7r-152593.pdf?src-supplier=Digikey, ComponentLink8URL=https://datasheet.ciiva.com/152/cx7r-152593.pdf?src-supplier=Digikey, ComponentLink9Description=https://datasheet.ciiva.com/152/cx7r-152594.pdf?src-supplier=Digikey, ComponentLink9URL=https://datasheet.ciiva.com/152/cx7r-152594.pdf?src-supplier=Digikey, Item Type=Capacitor, Manufacturer Part Number=12063C474KAT2A, Pricing="2000=0.0614, 6000=0.0591, 10000=0.0566, 20000=0.0567, 40000=0.0554, 80000=0.053 (USD)", RoHS=Yes, Stock=38000, Supplier="Future Electronics"
C18: library part CC0603KRX7R9BB683, "CAP CER 0.068UF 50V X7R 0603", Case Code (Imperial)=0603, Case Code (Metric)=1608, Dielectric=X7R, LCSC Part Number=C107098, Manufacturer=Yageo, Max Operating Temperature=125°C, Min Operating Temperature=-55°C, Supplier Part Number=3015344, Tolerance=10%, Voltage Rating=50V, Case/Package=0603, ComponentLink1Description=http://www.mouser.com/ds/2/447/Yageo_UPY-GP_NP0_16V-to-50V_9-358835.pdf?src-supplier=Mouser, ComponentLink1URL=http://www.mouser.com/ds/2/447/Yageo_UPY-GP_NP0_16V-to-50V_9-358835.pdf?src-supplier=Mouser, ComponentLink2Description=https://datasheet.octopart.com/CC0603KRX7R9BB683-Yageo-datasheet-166511530.pdf?src-supplier=Future+Electronics, ComponentLink2URL=https://datasheet.octopart.com/CC0603KRX7R9BB683-Yageo-datasheet-166511530.pdf?src-supplier=Future+Electronics, ComponentLink3Description=http://www.yageo.com/documents/recent/UPY-GPHC_X7R_6.3V-to-50V_18.pdf?src-supplier=Digikey, ComponentLink3URL=http://www.yageo.com/documents/recent/UPY-GPHC_X7R_6.3V-to-50V_18.pdf?src-supplier=Digikey, ComponentLink4Description=https://www.yageo.com/upload/media/product/productsearch/datasheet/mlcc/UPY-GPHC_X7R_6.3V-to-50V_18.pdf?src-supplier=Digikey, ComponentLink4URL=https://www.yageo.com/upload/media/product/productsearch/datasheet/mlcc/UPY-GPHC_X7R_6.3V-to-50V_18.pdf?src-supplier=Digikey, ComponentLink5Description=https://datasheet.octopart.com/CC0603KRX7R9BB683-Yageo-datasheet-140260305.pdf?src-supplier=Newark, ComponentLink5URL=https://datasheet.octopart.com/CC0603KRX7R9BB683-Yageo-datasheet-140260305.pdf?src-supplier=Newark, ComponentLink6Description=http://www.yageo.com/documents/recent/UPY-GPHC_X7R_6.3V-to-50V_9.pdf?src-supplier=Future+Electronics, ComponentLink6URL=http://www.yageo.com/documents/recent/UPY-GPHC_X7R_6.3V-to-50V_9.pdf?src-supplier=Future+Electronics, Halogen Free="Halogen Free", Item Type=Capacitors, Lead Free="Lead Free", Length=0.063inch, Manufacturer Part Number=CC0603KRX7R9BB683, Material=4241ConductorMaterial, Mounting Technology="Surface Mount", Packaging="Tape and Reel", Pricing="4000=0.0058, 16000=0.0055, 60000=0.0052, 160000=0.005, 400000=0.0047 (USD)", RoHS=Yes, RoHS Compliant=Yes, Series=CC, Stock=52000, Supplier="Future Electronics", Termination=SMD/SMT, Thickness=0.035inch, Voltage Rating (DC)=50V, Weight=7.1E-05oz, Width=0.031inch
C19: library part CC0603KRX7R7BB224, "CAP CER 0.22UF 16V X7R 0603", Manufacturer=Yageo, Supplier Part Number=311-1426-1-ND, Voltage Rating (DC)=16V, ComponentLink1Description=https://datasheet.ciiva.com/11788/0900766b80d84f1d-11788400.pdf?src-supplier=Rs, ComponentLink1URL=https://datasheet.ciiva.com/11788/0900766b80d84f1d-11788400.pdf?src-supplier=Rs, ComponentLink2Description=https://datasheet.ciiva.com/176/mlccorderingcode-176606.pdf?src-supplier=Digikey, ComponentLink2URL=https://datasheet.ciiva.com/176/mlccorderingcode-176606.pdf?src-supplier=Digikey, ComponentLink3Description=https://datasheet.ciiva.com/176/mlccorderingcode-176607.pdf?src-supplier=Digikey, ComponentLink3URL=https://datasheet.ciiva.com/176/mlccorderingcode-176607.pdf?src-supplier=Digikey, ComponentLink4Description=https://datasheet.ciiva.com/176/mlccorderingcode-176608.pdf?src-supplier=Digikey, ComponentLink4URL=https://datasheet.ciiva.com/176/mlccorderingcode-176608.pdf?src-supplier=Digikey, Halogen Free=5694HalogenFree, Item Type=Capacitor, Lead Free=5697LeadFree, Manufacturer Part Number=CC0603KRX7R7BB224, Material=4241ConductorMaterial, Pricing="1=0.1, 10=0.058, 50=0.0334, 100=0.0258, 500=0.01944, 1000=0.01528 (USD)", RoHS=Yes, Stock=45192, Supplier=Digikey
C20: library part CC1206KKX7R9BB474, "CAP CER 0.47UF 50V X7R 1206", LCSC Part Number=C277483, Manufacturer=Yageo, ComponentLink1Description=https://datasheet.ciiva.com/13210/upy-gp-np0-16v-to-50v-8-13210236.pdf?src-supplier=Mouser, ComponentLink1URL=https://datasheet.ciiva.com/13210/upy-gp-np0-16v-to-50v-8-13210236.pdf?src-supplier=Mouser, ComponentLink2Description=https://datasheet.ciiva.com/181/mlccorderingcode-181013.pdf?src-supplier=Digikey, ComponentLink2URL=https://datasheet.ciiva.com/181/mlccorderingcode-181013.pdf?src-supplier=Digikey, ComponentLink3Description=https://datasheet.ciiva.com/181/mlccorderingcode-181014.pdf?src-supplier=Digikey, ComponentLink3URL=https://datasheet.ciiva.com/181/mlccorderingcode-181014.pdf?src-supplier=Digikey, ComponentLink4Description=https://datasheet.ciiva.com/181/mlccorderingcode-181015.pdf?src-supplier=Digikey, ComponentLink4URL=https://datasheet.ciiva.com/181/mlccorderingcode-181015.pdf?src-supplier=Digikey, Item Type=Capacitor, Manufacturer Part Number=CC1206KKX7R9BB474, Material=4241ConductorMaterial, Pricing="3000=0.0393, 9000=0.0378, 15000=0.0371, 30000=0.0362, 60000=0.0349 (USD)", RoHS=Yes, Stock=36000, Supplier="Future Electronics"
C21: library part 50SVPF10M, "CAP ALUM POLY 10UF 20% 50V SMD", LCSC Part Number=C2162323, Manufacturer=Panasonic, Supplier Part Number=667-50SVPF10M, Category="Polymer Capacitors", ComponentLink1Description=https://datasheet.ciiva.com/48542/svpf-eng-ds-48542427.pdf?src-supplier=Distrelec, ComponentLink1URL=https://datasheet.ciiva.com/48542/svpf-eng-ds-48542427.pdf?src-supplier=Distrelec, ComponentLink2Description=https://datasheet.ciiva.com/24216/svpf-os-262415-24216043.pdf?src-supplier=Mouser, ComponentLink2URL=https://datasheet.ciiva.com/24216/svpf-os-262415-24216043.pdf?src-supplier=Mouser, ComponentLink3Description=https://datasheet.ciiva.com/25761/1734360-25761263.pdf?src-supplier=Farnell, ComponentLink3URL=https://datasheet.ciiva.com/25761/1734360-25761263.pdf?src-supplier=Farnell, Item Type=Capacitor, Manufacturer Part Number=50SVPF10M, Material=4242ConductorMaterial, Pricing="1=1.12, 10=0.801, 50=0.801, 100=0.665, 1000=0.555, 10000=0.504 (USD)", RoHS=Yes, Stock=29802, Supplier=Mouser
C22: "CAP CER 1000PF 100V X7R 0603", LCSC Part Number=C2167292, Manufacturer="Kyocera AVX", ComponentLink1Description=https://datasheet.ciiva.com/5422/cx7r-218113-5422905.pdf?src-supplier=Mouser, ComponentLink1URL=https://datasheet.ciiva.com/5422/cx7r-218113-5422905.pdf?src-supplier=Mouser, ComponentLink2Description=https://datasheet.ciiva.com/11499/cx7r-11499669.pdf?src-supplier=Avnet, ComponentLink2URL=https://datasheet.ciiva.com/11499/cx7r-11499669.pdf?src-supplier=Avnet, ComponentLink3Description=https://datasheet.ciiva.com/2987/cx7r-2987733.pdf?src-supplier=Avnet, ComponentLink3URL=https://datasheet.ciiva.com/2987/cx7r-2987733.pdf?src-supplier=Avnet, ComponentLink4Description=https://datasheet.ciiva.com/150/cx7r-150395.pdf?src-supplier=Digikey, ComponentLink4URL=https://datasheet.ciiva.com/150/cx7r-150395.pdf?src-supplier=Digikey, ComponentLink5Description=https://datasheet.ciiva.com/150/cx7r-150396.pdf?src-supplier=Digikey, ComponentLink5URL=https://datasheet.ciiva.com/150/cx7r-150396.pdf?src-supplier=Digikey, ComponentLink6Description=https://datasheet.ciiva.com/150/cx7r-150397.pdf?src-supplier=Digikey, ComponentLink6URL=https://datasheet.ciiva.com/150/cx7r-150397.pdf?src-supplier=Digikey, ComponentLink7Description=https://datasheet.ciiva.com/1124/1679506-1124198.pdf?src-supplier=Element14, ComponentLink7URL=https://datasheet.ciiva.com/1124/1679506-1124198.pdf?src-supplier=Element14, ComponentLink8Description=https://datasheet.ciiva.com/22693/1679506-22693579.pdf?src-supplier=Element14, ComponentLink8URL=https://datasheet.ciiva.com/22693/1679506-22693579.pdf?src-supplier=Element14, ComponentLink9Description=https://datasheet.ciiva.com/7855/1679506-7855033.pdf?src-supplier=Element14, ComponentLink9URL=https://datasheet.ciiva.com/7855/1679506-7855033.pdf?src-supplier=Element14, ComponentLink10Description=https://datasheet.ciiva.com/7855/84526-7855189.pdf?src-supplier=Element14, ComponentLink10URL=https://datasheet.ciiva.com/7855/84526-7855189.pdf?src-supplier=Element14, ComponentLink11Description=https://datasheet.ciiva.com/16289/cx7r-16289400.pdf?src-supplier=Future+Electronics, ComponentLink11URL=https://datasheet.ciiva.com/16289/cx7r-16289400.pdf?src-supplier=Future+Electronics, ComponentLink12Description=https://datasheet.ciiva.com/14594/70001075-14594623.pdf?src-supplier=Allied+Electronics, ComponentLink12URL=https://datasheet.ciiva.com/14594/70001075-14594623.pdf?src-supplier=Allied+Electronics, ComponentLink13Description=https://datasheet.ciiva.com/14600/70001075-14600988.pdf?src-supplier=Allied+Electronics, ComponentLink13URL=https://datasheet.ciiva.com/14600/70001075-14600988.pdf?src-supplier=Allied+Electronics, Item Type=Capacitor, Lead Free=5697LeadFree, Manufacturer Part Number=06031C102KAT2A, Pricing="4000=0.0086, 8000=0.0084, 16000=0.0082, 24000=0.008, 32000=0.0079 (USD)", RoHS=Yes, Stock=656000, Supplier=Avnet
C23: library part 06035A100JAT2A, "CAP CER 10PF 50V C0G/NP0 0603", Case/Package=0603, Dielectric=C0G, Insulation Resistance=100GR, LCSC Part Number=C79547, Manufacturer="Kyocera AVX", Manufacturer Part Number=06035A100JAT2A/4K, Max Operating Temperature=125°C, Min Operating Temperature=-55°C, Supplier Part Number 1=478-1163-1-ND, Temperature Coefficient=30ppm/°C, Tolerance=5%, Voltage=50V, Capacitance=10pF, Depth=0.81mm, Height=0.9mm, Item Type=Capacitor, Lead Free="Lead Free", Length=1.6mm, Mount="Surface Mount", Number of Pins=2, Packaging="Cut Tape", Pricing 1="1=0.1, 10=0.05, 50=0.0272, 100=0.0222, 500=0.01586, 1000=0.01246 (USD)", REACH SVHC="No SVHC", Stock 1=196463, Supplier 1=Digi-Key, Thickness=864um, Voltage Rating (DC)=50V, Width=810um
C24: library part DE1E3RA222MA4BN01F, "2200 pF ±20% 250VAC Ceramic Capacitor E Radial, Disc", LCSC Part Number=C343981, Manufacturer=Murata, ComponentLink1Description=http://www.farnell.com/datasheets/2608335.pdf?src-supplier=Farnell, ComponentLink1URL=http://www.farnell.com/datasheets/2608335.pdf?src-supplier=Farnell, ComponentLink2Description=http://www.farnell.com/datasheets/2608335.pdf?src-supplier=Newark, ComponentLink2URL=http://www.farnell.com/datasheets/2608335.pdf?src-supplier=Newark, ComponentLink3Description=https://datasheet.octopart.com/DE1E3RA222MA4BN01F-Murata-datasheet-166166226.pdf?src-supplier=TME, ComponentLink3URL=https://datasheet.octopart.com/DE1E3RA222MA4BN01F-Murata-datasheet-166166226.pdf?src-supplier=TME, Item Type=Capacitors, Manufacturer Part Number=DE1E3RA222MA4BN01F, Pricing="1=0.42, 10=0.271, 50=0.271, 100=0.146, 1000=0.114, 10000=0.097 (USD)", RoHS=Yes, Stock=37677, Supplier=Mouser
C25 C33: "22nF -40℃~+100℃ ±5% 630V Plugin,P=7.5mm Polypropylene Film Capacitors (CBB) ROHS", LCSC Part Number=C390073, Manufacturer=KYET, Package=Plugin,P=7.5mm, ComponentLink1Description=LCSC, ComponentLink1URL=https://www.lcsc.com/product-detail/Polypropylene-Film-Capacitors-CBB_KYET-KP223J2J0701_C390073.html, Item Type=Capacitor, Manufacturer Part Number=KP223J2J0701
C26 C27 C38 C39: library part UMK316AB7475KL-T, "CAP CER 4.7UF 50V X7R 1206", Case Code (Imperial)=1206, Case Code (Metric)=3216, Dielectric=X7R, LCSC Part Number=C92853, Manufacturer="Taiyo Yuden", Max Operating Temperature=125°C, Min Operating Temperature=-55°C, Package Quantity=2000, Tolerance=10%, Voltage Rating=50V, Case/Package=1206, ComponentLink1Description=https://datasheet.ciiva.com/170/umk316ab7475kl-t-ss-170928.pdf?src-supplier=Digikey, ComponentLink1URL=https://datasheet.ciiva.com/170/umk316ab7475kl-t-ss-170928.pdf?src-supplier=Digikey, ComponentLink2Description=https://datasheet.ciiva.com/2990/umk316ab7475kl-t-ss-2990070.pdf?src-supplier=Avnet, ComponentLink2URL=https://datasheet.ciiva.com/2990/umk316ab7475kl-t-ss-2990070.pdf?src-supplier=Avnet, ComponentLink3Description=https://datasheet.ciiva.com/15922/1010umk316ab7475kl-t-15922628.pdf?src-supplier=Onlinecomponents.com, ComponentLink3URL=https://datasheet.ciiva.com/15922/1010umk316ab7475kl-t-15922628.pdf?src-supplier=Onlinecomponents.com, ComponentLink4Description=https://datasheet.ciiva.com/7975/1481447-7975911.pdf?src-supplier=Element14, ComponentLink4URL=https://datasheet.ciiva.com/7975/1481447-7975911.pdf?src-supplier=Element14, ComponentLink5Description=https://datasheet.ciiva.com/5413/mlcc-all-e-541559-5413006.pdf?src-supplier=Mouser, ComponentLink5URL=https://datasheet.ciiva.com/5413/mlcc-all-e-541559-5413006.pdf?src-supplier=Mouser, Construction=Flat, Depth=1.6mm, Height=1.6mm, Item Type=Capacitor, Length=3.2mm, Manufacturer Part Number=UMK316AB7475KL-T, Mounting Technology="Surface Mount", Packaging="Tape and Reel", Pins=2, Pricing="1=0.3, 10=0.198, 50=0.146, 100=0.1189, 500=0.09386, 1000=0.07925 (USD)", Radiation Hardening=No, Reach SVHC Compliant=Unknown, RoHS=Yes, RoHS Compliant=Yes, Series=M, Stock=392550, Supplier=Digikey, Termination=SMD/SMT, Voltage Rating (DC)=50V, Width=1.6mm
C28 C29 C30 C31: library part EEU-FR1V681B, "CAP ALUM 680UF 20% 35V RADIAL TH", Case/Package=Radial, ESR (Equivalent Series Resistance)=20mR, LCSC Part Number=C178718, Manufacturer=Panasonic, Max Operating Temperature=105°C, Min Operating Temperature=-40°C, Package Quantity=500, Ripple Current=2.18A, Tolerance=20%, Voltage Rating=35V, ComponentLink1Description=https://datasheet.ciiva.com/11677/aba0000ce132-11677705.pdf?src-supplier=Avnet, ComponentLink1URL=https://datasheet.ciiva.com/11677/aba0000ce132-11677705.pdf?src-supplier=Avnet, ComponentLink2Description=https://datasheet.ciiva.com/15941/aba0000ce132-15941222.pdf?src-supplier=Onlinecomponents.com, ComponentLink2URL=https://datasheet.ciiva.com/15941/aba0000ce132-15941222.pdf?src-supplier=Onlinecomponents.com, ComponentLink3Description=https://datasheet.ciiva.com/43469/1653413-43469593.pdf?src-supplier=Farnell, ComponentLink3URL=https://datasheet.ciiva.com/43469/1653413-43469593.pdf?src-supplier=Farnell, ComponentLink4Description=https://datasheet.ciiva.com/46371/1653413-46371786.pdf?src-supplier=Element14, ComponentLink4URL=https://datasheet.ciiva.com/46371/1653413-46371786.pdf?src-supplier=Element14, ComponentLink5Description=https://datasheet.ciiva.com/29248/448590-da-01-en-alu-kondensator-fr-r-680-uf-35v-500st-29248054.pdf?src-supplier=Conrad, ComponentLink5URL=https://datasheet.ciiva.com/29248/448590-da-01-en-alu-kondensator-fr-r-680-uf-35v-500st-29248054.pdf?src-supplier=Conrad, Diameter=10mm, Features="General Purpose", Height=20mm, Height - Seated (Max)=0.866inch, Impedance=20mR, Item Type=Capacitor, Lead Diameter=0.6mm, Lead Pitch=5mm, Lead/Base Style=Straight, Length=20mm, Life (Hours)=10000Hour, Manufacturer Part Number=EEU-FR1V681B, Mounting Technology="Through Hole", Packaging="Tape and Reel", Pricing="1=0.93, 10=0.674, 50=0.5894, 100=0.4803 (USD)", Radiation Hardening=No, Reach SVHC Compliant=Yes, RoHS=Yes, RoHS Compliant=Yes, Series=FR, Stock=566, Supplier=Digikey, Termination=Radial, Voltage Rating (DC)=35V
C32 C41 C43: library part CC1206KRX7R9BB104, "CAP CER 0.1UF 50V X7R 1206", Case Code (Imperial)=1206, Case Code (Metric)=3216, Dielectric=X7R, Insulation Resistance=100GR, LCSC Part Number=311-1179-1-ND, Manufacturer=Yageo, Max Operating Temperature=125°C, Min Operating Temperature=-55°C, Tolerance=10%, Voltage=50V, Case/Package=1206, ComponentLink1Description=https://datasheet.ciiva.com/11786/0900766b80d84f1d-11786968.pdf?src-supplier=Rs, ComponentLink1URL=https://datasheet.ciiva.com/11786/0900766b80d84f1d-11786968.pdf?src-supplier=Rs, ComponentLink2Description=https://datasheet.ciiva.com/7978/1489800-7978230.pdf?src-supplier=Element14, ComponentLink2URL=https://datasheet.ciiva.com/7978/1489800-7978230.pdf?src-supplier=Element14, ComponentLink3Description=https://datasheet.ciiva.com/28450/1489800-28450892.pdf?src-supplier=Element14, ComponentLink3URL=https://datasheet.ciiva.com/28450/1489800-28450892.pdf?src-supplier=Element14, ComponentLink4Description=https://datasheet.ciiva.com/144/mlccorderingcode-144906.pdf?src-supplier=Digikey, ComponentLink4URL=https://datasheet.ciiva.com/144/mlccorderingcode-144906.pdf?src-supplier=Digikey, ComponentLink5Description=https://datasheet.ciiva.com/144/mlccorderingcode-144905.pdf?src-supplier=Digikey, ComponentLink5URL=https://datasheet.ciiva.com/144/mlccorderingcode-144905.pdf?src-supplier=Digikey, ComponentLink6Description=https://datasheet.ciiva.com/144/mlccorderingcode-144907.pdf?src-supplier=Digikey, ComponentLink6URL=https://datasheet.ciiva.com/144/mlccorderingcode-144907.pdf?src-supplier=Digikey, ComponentLink7Description=https://datasheet.ciiva.com/5425/upy-gp-np0-16v-to-50v-8-3714-5425561.pdf?src-supplier=Mouser, ComponentLink7URL=https://datasheet.ciiva.com/5425/upy-gp-np0-16v-to-50v-8-3714-5425561.pdf?src-supplier=Mouser, ComponentLink8Description=https://datasheet.ciiva.com/28363/1734573-28363672.pdf?src-supplier=Element14, ComponentLink8URL=https://datasheet.ciiva.com/28363/1734573-28363672.pdf?src-supplier=Element14, ComponentLink9Description=https://datasheet.ciiva.com/46385/1734573-46385063.pdf?src-supplier=Element14, ComponentLink9URL=https://datasheet.ciiva.com/46385/1734573-46385063.pdf?src-supplier=Element14, ComponentLink10Description=https://datasheet.ciiva.com/15189/getdatasheetpartid-251811-15189275.pdf?src-supplier=Verical, ComponentLink10URL=https://datasheet.ciiva.com/15189/getdatasheetpartid-251811-15189275.pdf?src-supplier=Verical, Depth=1.6mm, Halogen Free=5694HalogenFree, Height=0.85mm, Item Type=Capacitor, Lead Free=5697LeadFree, Length=3.2mm, Manufacturer Part Number=CC1206KRX7R9BB104, Material=Ceramic, Mounting Technology="Surface Mount", Packaging="Tape and Reel", Pins=2, Pricing="1=0.19, 10=0.128, 50=0.0764, 100=0.0601, 500=0.04436, 1000=0.03672 (USD)", Radiation Hardening=No, Reach SVHC Compliant=Unknown, RoHS=Yes, RoHS Compliant=Yes, Series=CC, Stock=520624, Supplier=Digikey, Termination=SMD/SMT, Voltage Rating=50V, Voltage Rating (DC)=50V